# Altium PCB Right-PCB-v1.0.PcbDoc (part 2 of 2)
Units mil, origin at the board's own origin, x right, y up, seen from the top; angles counter-clockwise.
Board outline 1062.99 x 944.88 mil, 4 copper layers (Top Layer, GND, PWR, Bottom Layer), stack 45.118 mil thick; 85 components, 60 nets, 287 pads, 128 vias.
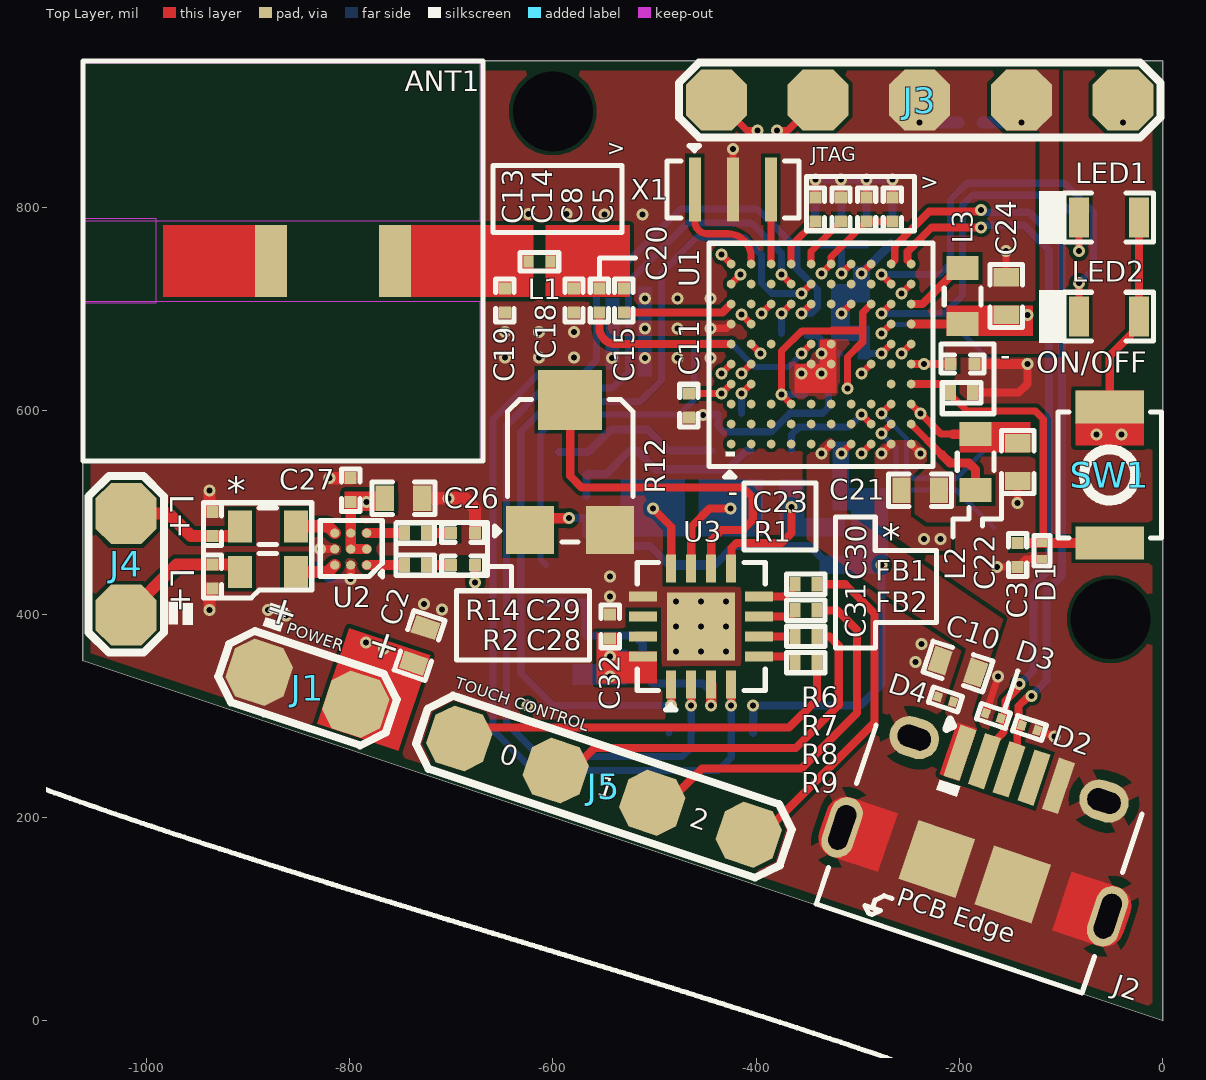
[diagram p0: Top Layer view]

## Via types
v1: diameter 11.81, hole 5.91, Top Layer to Bottom Layer, tented both sides, 128 vias

## Nets (pads, with @x,y where several pads share a name; then routed paths per layer and width w, separated by ;. In a path a pad name is that pad's centre, name@x,y a point inside that pad or via, vN(x,y) a via of type N, cw(c..) or ccw(c..) an arc to the next point about the centre after c; other vN are vias at no path point) (continued)
EASY_TUNE: SB6.1 U1.E6 | length 482.7
  Top Layer w7: v1(-355.22,656.46) U1.E6
  Bottom Layer w6: SB6.1 -612.39,454 -612.39,577.32 -593.25,596.46 -475.75,596.46 -461.02,611.18 -461.02,659.48 -453.12,667.38 -425.55,667.38 -401.26,643.1 -368.59,643.1 v1(-355.22,656.46)
GND: C1.2 C2.2 C3.1 C4.1 C5.1 C6.1 C7.2 C8.1 C9.2 C10.2 C11.1 C12.2 C13.2 C14.2 C16.2 C17.1 C18.1 C19.1 C21.1 C22.1 C23.1 C24.1 C25.1 C26.1 C27.1 C29.1 C30.1 C31.1 C32.2 D1.1 D2.1 D3.1 D4.1 J1.2 J2.5 J2.MP1 J2.MP2 J2.S1 J2.S2 J2.S3 J2.S4 J3.3 R1.2 R12.3 R13.2 SB2.1 SB4.1 SB10.2 SB14.2 U1.A7 U1.E5 U1.F5 U1.F6 U2.A2 U2.B3 U3.13 U3.17 X1.2 | length 1243.3
  Top Layer w7: C11.1 -464.53,595.08 -453.42,595.08 v1(-452.5,596) ; v1(-445,681.35) -429.21,681.35 -425.03,685.53 U1.A7 ; X1.2 v1(-422.83,858) ; v1(-355.22,636.78) U1.E5 ; C13.2 v1(-341.51,827.84) ; v1(-335.54,636.78) U1.F5 ; v1(-335.54,656.46) U1.F6 ; C14.2 v1(-316.4,827.84) ; C8.1 v1(-291.29,827.84) ; C5.1 v1(-265.87,827.84) ; C23.1@-186.02,645.17 C23.1 ; D3.1 -173.53,303.53 v1(-161.74,338.76) ; v1(-162.74,446.42) C3.1 -134.76,454.29 D1.1 ; C24.1 v1(-154,757.27) ; v1(-142.64,509.5) C22.1 ; D2.1 -122.99,285.36 v1@-106.79,279.94
  Top Layer w8: v1(-829.31,464) U2.B3 ; v1(-799,434.8) U2.A2 ; R1.2 -141.47,618 -133,626.47 v1(-133,646.16)
  Top Layer w10: C23.1 v1(-133,646.16)
  Top Layer w12: v1(-938,404.14) C31.1@-938,425.21 ; C30.1@-938,500.43 v1(-938,521.5) ; v1(-820.07,533.81) C27.1 ; C26.1 -686.55,514 -676.58,504.02 C29.1
  Bottom Layer w7: v1(-452.5,596) -451.8,596.7 -438.6,596.7 C12.2 ; v1@-452.5,597.09 v1@-452.34,597.25 ; C12.2@-437.59,597.09 -437.59,584.76 -432.31,579.48 -384.97,579.48 -366.77,597.68 -334.61,597.68 -328.94,603.34 -328.94,630.18 v1(-335.54,636.78) ; v1(-355.22,636.78) v1(-335.54,636.78) ; C16.2 -349.6,674.46 -340.31,674.46 -335.54,669.69 v1(-335.54,656.46) ; C6.1 C6.1@-341.76,787.87 ; v1@-341.76,827.6 v1(-341.51,827.84) ; C7.2 v1(-335.54,656.46) ; v1(-316.4,827.84) v1@-316.13,827.57 ; C4.1@-316.13,787.9 C4.1 ; v1(-335.54,636.78) v1(-335.54,656.46)
  Bottom Layer w8: v1(-829.31,464) -829.31,443.16 -820.94,434.8 v1(-799,434.8) ; C6.1@-341.76,787.87 v1@-341.76,827.6 ; v1(-341.51,827.84) v1(-316.4,827.84) v1(-291.29,827.84) ; C4.1@-316.13,787.9 v1@-316.13,827.57 ; C17.1 v1(-291.29,827.84) ; C1.2 v1(-265.87,827.84) v1(-291.29,827.84)
  Bottom Layer w12: v1(-239.09,884) C25.1
  other v1: -106.48,279.31 -242.93,352.81 -478.62,363.27 -454.02,363.27 -429.41,363.27 -237.25,370.67 -478.62,387.87 -454.02,387.87 -429.41,387.87 -862.8,398.46 -880.65,404.14 -709.1,404.44 -726.95,410.12 -478.62,412.48 -454.02,412.48 -429.41,412.48 -543.62,417.4 -543.62,437.09 -703,514 -541.67,651.87 -509.44,651.87 -477.22,651.87 -445,651.87 -647.08,652.44 -613.48,652.44 -579.48,652.44 -647.08,677.67 -613.69,677.87 -579.48,677.67 -509.44,681.35 -477.22,681.35 -509.44,710.83 -477.22,710.83 -445,710.83 -624.05,793.86 -586.65,793.7 -549.25,793.54 -511.85,793.39
LDO31_VO: C9.1 C23.2 C25.2 J3.2 U1.C8 U1.D3 U1.H8 U1.K5 | length 329
  Top Layer w7: v1(-394.59,695.83) U1.C8 ; v1@-373.61,616.17 v1(-374.91,616.17) ; U1.D3 v1(-374.91,616.17) ; -316.84,678.84 -354.94,678.84 -374.91,658.87 v1(-374.91,616.17) ; v1(-309.95,622.07) -309.95,653.05 -295,668 -295,697 U1.H8
  Top Layer w8: U1.K5 v1(-234.55,646.16) C23.2
  Bottom Layer w7: v1(-374.91,616.17) C9.1
  Bottom Layer w12: C25.2 v1(-138.91,884)
LED1: LED1.2 U1.J8 | length 381.4
  Top Layer w7: v1(-276.48,695.83) U1.J8 ; v1(-82.32,757.27) LED1.2
  Bottom Layer w7: v1(-276.48,695.83) -214.59,695.83 -196.94,713.48 -196.94,802.4 -187.06,812.28 -106.97,812.28 -82.32,787.63 v1(-82.32,757.27)
LED2: LED2.2 U1.J9 | length 416.4
  Top Layer w7: v1(-276.48,734.28) U1.J9 ; LED2.2 v1(-82.32,725.87)
  Bottom Layer w7: v1(-276.48,734.28) -219.53,734.28 -208.75,745.06 -208.75,808.03 -192.69,824.09 -96.37,824.09 -68,795.73 -68,740.2 v1(-82.32,725.87)
MFB: C3.2 D1.2 R1.1 SW1.2 U1.K4 | length 357.1
  Top Layer w7: R1.1@-208.42,615.79 -192.44,599.81 -125.22,599.81 -117.4,591.99 -117.4,470.48 -117.83,470.04 D1.2
  Top Layer w8: U1.K4 -215.17,626.47 -208.66,619.97 R1.1
  Top Layer w10: C3.2 D1.2 ; D1.2@-117.83,470.04 SW1.2
NetANT1_1: ANT1.1 C19.2 L1.2
NetC12_1: C12.1 U1.B4 | length 33
  Top Layer w7: v1(-414.28,617.09) U1.B4
  Bottom Layer w7: C12.1 v1(-414.28,617.09)
NetC13_1: C13.1 U1.D10 | length 51.9
  Top Layer w7: U1.D10 -365.53,762.49 C13.1
NetC14_1: C14.1 U1.E10 | length 54.1
  Top Layer w7: U1.E10 -345.84,757.06 C14.1
NetC15_2: C15.2 C18.2 C20.2 L1.1
NetC28_2: C28.2 R2.1 | length 24.3
  Top Layer w10: R2.1 C28.2
NetC29_2: C29.2 R14.1 | length 24.3
  Top Layer w10: R14.1 C29.2
NetFB1_1: FB1.1 U2.C3 | length 40.8
  Top Layer w12: FB1.1 -821.46,486.46 U2.C3
NetFB2_1: FB2.1 U2.A3 | length 40.8
  Top Layer w12: FB2.1 -821.46,441.54 U2.A3
NetP1_1: P1.1 U1.J7 | length 142.9
  Top Layer w7: v1(-276.48,676.15) U1.J7
  Bottom Layer w5: v1(-276.48,676.15) -267.7,684.93 -205.27,684.93 P1.1
NetP2_1: P2.1 U1.J3 | length 183.8
  Top Layer w7: v1(-276.48,597.41) U1.J3
  Bottom Layer w5: v1(-276.48,597.41) -251.79,572.71 -251.79,540.07 -245.41,533.7 -202.8,533.7 P2.1
NetP3_1: P3.1 U1.J2 | length 178.4
  Top Layer w7: v1(-276.48,577.72) U1.J2
  Bottom Layer w5: v1(-276.48,577.72) -262.15,563.38 -262.15,534.49 -249.87,522.22 -203.22,522.22 P3.1
NetR2_2: R2.2 U2.A1 | length 37.1
  Top Layer w10: U2.A1 R2.2
NetR6_1: R6.1 U3.8 | length 41.2
  Top Layer w8: U3.8 -371.91,417.4 -361.84,427.46 R6.1
NetR7_2: R7.2 U3.7 | length 38.7
  Top Layer w8: U3.7 -365.87,397.72 -361.84,401.75 R7.2
NetR8_2: R8.2 U3.6 | length 35.1
  Top Layer w8: U3.6 R8.2
NetR9_2: R9.2 U3.5 | length 38.8
  Top Layer w8: U3.5 -365.95,358.35 -361.84,354.24 R9.2
NetR14_2: R14.2 U2.C1 | length 37.1
  Top Layer w10: U2.C1 R14.2
NetSB1_2: SB1.2 SB2.2 SB5.2 U3.9 | length 111
  Top Layer w8: U3.9 -424.17,445.28 -424.17,465.31 -419.48,470 -375,470 -365.28,479.72 v1(-365.28,505.39)
NetSB3_2: SB3.2 SB4.2 SB6.2 U3.3 | length 269.5
  Top Layer w10: v1(-444.17,310) U3.3
  Bottom Layer w8: SB6.2 SB4.2 SB3.2 -520.22,379 -511.59,370.37 -511.59,341.32 -502.01,331.73 -452.49,331.73 -444.17,323.41 v1(-444.17,310)
OUT_0: R3.1 U1.E8 U3.4 | length 1172.1
  Top Layer w7: v1(-355.22,695.83) U1.E8
  Top Layer w8: v1(-424.49,310) U3.4
  Bottom Layer w7: v1(-424.49,310) -424.49,258.95 -437.28,246.16 -619.21,246.16 -659.14,286.08 -659.14,591.4 -614.11,636.43 -570.41,636.43 -556.99,649.85 -556.99,716.33 -474.45,798.87 -398.77,798.87 -359.96,760.06 -359.96,739.93 -339.45,719.43 -339.45,701.76 -345.38,695.83 v1(-355.22,695.83)
OUT_1: R4.1 U1.D9 U3.2 | length 1005.4
  Top Layer w7: v1(-374.91,734.28) U1.D9
  Top Layer w8: v1(-463.86,310) U3.2
  Bottom Layer w7: v1(-463.86,310) -463.86,283 R4.1 -463.93,268.73 -472.62,260.04 -613.08,260.04 -645.5,292.47 -645.5,585.92 -609,622.43 -541.64,622.43 -525.65,638.42 -525.65,726.85 -467.64,784.85 -404.55,784.85 -374.91,755.21 v1(-374.91,734.28)
OUT_2: R5.1 U1.E9 U3.1 | length 889.8
  Top Layer w7: v1(-355.22,715.52) U1.E9
  Top Layer w8: v1(-483.54,310) U3.1
  Bottom Layer w7: v1(-483.54,310) R5.1 -599.74,310 -631.68,341.93 -631.68,579.78 -602.03,609.43 -513.96,609.43 -493.29,630.1 -493.29,735.89 -458.59,770.59 -411.59,770.59 -394.67,753.67 -394.67,725.86 -384.33,715.52 v1(-355.22,715.52)
OUT_L+: C30.2 FB1.2 J4.1 | length 127.5
  Top Layer w12: J4.1 -978.49,499 -956.3,476.81 -913.7,476.81 -907.89,482.62 FB1.2
OUT_L-: C31.2 FB2.2 J4.2 | length 148.5
  Top Layer w12: J4.2 -970.17,448.83 -938,448.83 -913.7,448.83 -907.89,443.02 -907.89,437.92 FB2.2@-913.7,432.11
PA1OP: C20.1 U1.A6 | length 153.8
  Top Layer w8: C20.1 -554.29,681.87 ccw(c-538.26,681.87) -538.26,665.84 U1.A6
RST_N: C16.1 J3.1 U1.D8 | length 719.6
  Top Layer w7: v1(-374.91,695.83) U1.D8
  PWR w6: v1(-374.91,695.83) -374.91,708.8 -382.83,716.72 -428.8,716.72 -436.67,724.59 -466.98,724.59 -475.41,733.02 -475.41,816.19 -463.75,827.84 -380.48,827.84 -305.77,902.55 -57.45,902.55 v1(-38.91,884)
  Bottom Layer w7: C16.1 v1(-374.91,695.83)
RTX: C15.1 U1.A8 | length 109.2
  Top Layer w8: C15.1 -432.94,696.85 U1.A8
SINGLE_BUTTON: SB5.1 U1.H2 | length 106.1
  Top Layer w7: v1(-296.17,596.48) U1.H2
  Bottom Layer w7: SB5.1 -365.07,576.71 -357.52,584.26 -308.4,584.26 v1(-296.17,596.48)
SYS_PWR: C21.2 LED1.1 LED2.1 SW1.1 U1.J1 U1.K1 U1.K6 U1.K9 | length 253.2
  Top Layer w4: v1@-257.42,657.08 v1(-256.8,656.46) ; v1@-257.42,714.9 v1(-256.8,715.52)
  Top Layer w7: v1(-276.48,558.04) U1.J1 ; v1(-256.8,656.46) U1.K6 ; v1(-256.8,715.52) U1.K9 ; U1.K1 v1(-238.04,558.04)
  Top Layer w8: SW1.1 -52,654.24 -23.27,682.97 LED1.1
  other v1: -235,473.85 -218.62,473.85 -64.8,577.02 -40.19,577.02
USB_D_N: D3.2 J2.2 U1.K10 | length 704.3
  Top Layer w7.69: U1.K10@-247.16,744.58 -250.91,748.34 -250.91,756.89 -227.16,780.65 -200.1,780.65 v1(-178.62,780.65) ; J2.2 cw(c-152.17,255.32) -168.46,271.62 -158.29,281.8 ccw(c-165.1,288.61) -155.46,288.61 -155.46,290.09 ccw(c-161.51,290.09) -157.23,294.37 -158.13,295.26 cw(c-156,297.38) D3.2 -159,298.12 -154.57,302.55 -154.57,314.58 -142.93,326.23 -142.93,327.9 -140.87,329.96 v1(-140.87,331.08)
  Bottom Layer w7.69: v1(-178.62,780.65) -177.51,780.65 -175.35,782.8 -136.4,782.8 -111.69,758.09 -111.69,443.31 -127.04,427.96 -127.04,344.79 -140.75,331.08 v1(-140.87,331.08)
USB_D_P: D2.2 J2.3 U1.J10 | length 752.1
  Top Layer w7.69: U1.J10 -267.1,744.85 -263.61,748.34 -263.61,762.15 -229.55,796.2 -197.71,796.2 -182.99,796.2 -182.33,796.87 -179.42,796.87 v1(-178.63,797.65) ; J2.3 -143.04,268.53 -143.04,279.13 cw(c-128.76,279.13) -139.59,288.45 ccw(c-145.45,293.42) -139,289.23 -138.71,289.69 D2.2 -138.34,291.73 -141.88,295.27 -141.88,309.33 -133.76,317.45 -132.2,317.45 -130.14,319.51 v1(-129.03,319.51)
  Bottom Layer w7.69: v1(-178.63,797.65) -177.52,797.65 -175.36,795.5 -131.14,795.5 -99,763.35 -99,438.05 -114.35,422.7 -114.35,334.19 v1(-129.03,319.51)
V_USB: C10.1 D4.2 J2.1 U1.F1 | length 13.3
  Top Layer w7: v1(-335.54,558.04) U1.F1
VBAT: C2.1 C26.2 C27.2 C32.1 J1.1 R3.2 R4.2 R5.2 R10.1 R12.1 SB1.1 SB3.1 SB7.2 SB11.2 U1.G1 U2.B1 U2.B2 U2.C2 U3.16 | length 703.5
  Top Layer w7: v1(-315.85,558.04) U1.G1
  Top Layer w8: R12.1 R12.1@-610.86,494.41
  Top Layer w10: C27.2 U2.C2 U2.B2 U2.B1 ; R12.1@-610.86,494.41 v1(-584,494.41)
  Bottom Layer w7: R4.2 R4.2@-485.58,284.9
  Bottom Layer w8: v1(-584,494.41) -583.96,494.46 R10.1@-566.93,494.46 ; R10.1 R10.1@-566.93,494.46 ; SB7.2 -486.01,448.5 -504.51,467 -556.37,467 -566.93,477.56 R10.1@-566.93,494.46 ; SB11.2 -440.67,448.5 -422.17,467 -347,467 -328.5,448.5 SB1.1 ; R3.2 v1(-402.83,310) -297.08,310 -276.48,330.59 v1(-276.48,448.5)
  Bottom Layer w10: SB7.2 SB11.2
  other v1: -625,310 -543.62,338.66 -543.62,358.35 -766.19,366.41 -784.05,372.09 -783.25,510.19
VCC_RF: C5.2 C8.2 U1.A10 U1.F10 | length 108.3
  Top Layer w7: v1(-433.96,753.96) U1.A10 ; v1(-335.54,735.2) U1.F10 -326.16,751.64 C8.2 C5.2
XO_N: U1.C10 X1.3 | length 73.5
  Top Layer w7: X1.3 -385.32,817.89 -385.32,744.69 U1.C10
XO_P: U1.B10 X1.1 | length 113.7
  Top Layer w7: X1.1 -460.24,786.5 ccw(c-448.13,786.5) -448.13,774.39 -427.87,774.39 cw(c-427.87,751.43) -404.9,751.43 U1.B10
pads on no net: ANT1.2 J2.4 U1.A1 U1.A2 U1.A3 U1.B1 U1.B2 U1.B3 U1.B8 U1.B9 U1.C1 U1.C2 U1.C3 U1.C6 U1.C9 U1.D1 U1.D2 U1.E1 U1.E2 U1.E3 U1.F2 U1.F3 U1.F8 U1.F9 U1.G2 U1.G3 U1.G9 U1.H3 U1.H9 U1.J4 U1.J5 U3.14 U3.15

## Polygon pours and split planes (outlines as drawn)
VBAT on Bottom Layer "VBAT_L04_P021" (solid, pour order 21): -634.83,319 -634.83,295.3 -615.18,275.65 -480.26,275.65 -480.26,293.66 -598,293.66 -623.34,319
LDO31_VO on Bottom Layer "LDO31_VO_L04_P018" (solid, pour order 18): -317.55,630.22 -317.55,606 -228,606 -228,656 -244,656 -244,630.22
GND on Bottom Layer "GND_L04_P000" (solid, remove dead copper, pour order 0): -667.17,935 -667.17,548 -1055,548 -1055,361.33 -10,13 -10,935
1V5 on Bottom Layer "1V5_L04_P002" (solid, pour order 2): -433,743 -433,679 -405.84,679 -405.84,743
SYS_PWR on Bottom Layer "SYS_PWR_L04_P001" (solid, pour order 1): -249,650.56 -249,663 -223,663 -223,574.19 -244,574.19 -244,545 -205.27,545 -205.27,674.46 -265,674.46 -265,650.56
VBAT on PWR "VBAT_L03_P019" (solid, pour order 19): -667.17,935 -667.17,548 -1055,548 -1055,361.33 -10,13 -10,935
SYS_PWR on PWR "SYS_PWR_L03_P017" (solid, pour order 17): -470,485 -470,412.48 -10,412.48 -10,890 -112,890 -112,485
1V5 on PWR "1V5_L03_P012" (solid, pour order 12): -390,745 -390,723.74 -423.74,723.74 -433.23,733.23 -462.41,733.23 -462.41,745
1V5 on PWR "1V5_L03_P007" (solid, pour order 7): -242.19,637 -242.19,583.18 -190,583.18 -190,890 -464,890 -464,733.22 -447,733.31 -447,772 -322,772 -322,727.35 -306,727.35 -306,747 -230.24,747 -230.24,637
1V2 on PWR "1V2_L03_P009" (solid, pour order 9): -286.39,611 -286.39,631 -326.5,631 -326.49,701.69 -309,701.69 -309,666 -270,666 -270,611
VCC_RF on PWR "VCC_RF_L03_P008" (solid, pour order 8): -441.29,768 -441.29,748 -361,748 -361,727.35 -327.1,727.35 -327.07,727.32 -327.07,768
SYS_PWR on PWR "SYS_PWR_L03_P003" (solid, pour order 3): -274.08,542 -282,549.92 -282,567 -266,567 -266,740 -234.55,740 -234.55,660.51 -246.79,660.51 -246.81,578 -190,578 -190,542
LDO31_VO on PWR "LDO31_VO_L03_P006" (solid, pour order 6): -309,608 -291,608 -291,627 -365,627 -365,667 -331,667 -331,706 -304,706 -304,682.43 -287,682.43 -287,723 -345,723 -345,686 -384.47,686 -384.47,707.72 -404,707.72 -404,682 -385.03,663.03 -385.03,644.19 -404,644.19 -404,606.51 -404,570 -345.23,570 -309,570
1V8 on PWR "1V8_L03_P005" (solid, pour order 5): -184,890 -184,536 -276,536 -287,547 -287,567 -305,567 -305,546.85 -315.85,536 -424,536 -424,625 -470,625 -470,494 -119,494 -119,890
GND on Top Layer "GND_L01_P011" (solid, remove dead copper, pour order 11): -667.17,935 -667.17,548 -1055,548 -1055,361.33 -10,13 -10,935
V_USB on Top Layer "V_USB_L01_P016" (solid, pour order 16): -219.47,242.11 -204.68,286.33 -213.87,302.88 -208.36,319.34 -195.08,359.13 -192.97,366.04 -264.01,412.51 -350.37,473.77 -350.37,555.75 -328.74,572.97 -321.76,572.97 -321.86,566.18 -328.17,559.29 -328.17,550.78 -328.07,544.86 -310.82,544.78 -310.82,500 -156.77,395.1 -179.28,327.78 -187.83,300.75 -182.77,287.34 -200.07,235.62
SYS_PWR on Top Layer "SYS_PWR_L01_P010" (solid, pour order 10): -283,489.75 -242.87,462.17 -208.42,462.17 -208.42,486.18 -233.37,486.18 -248,496.57 -248,534.5 -232,550.5 -232,561 -242.23,571.23 -271.77,571.23 -283,560
LDO31_VO on Top Layer "LDO31_VO_L01_P004" (solid, pour order 4): -154,876 -121,876 -121,668.46 -214.57,668.46 -214.57,640.26 -202.76,640.25 -202.76,656.47 -102,656.47 -102,936 -154,936
GND on GND "GND_L02_P020" (solid, pour order 20): -667.17,935 -667.17,548 -1055,548 -1055,361.33 -10,13 -10,935

## Other copper
Top Layer:
  rectangle net LDO31_VO: -327,675 -292,683
  rectangle net GND: -337.28,617.84 -321,670.24
  rectangle net GND: -362,617.84 -321,646
  region net V_USB: -219.47,242.11 -200.07,235.62 -182.77,287.34 -202.16,293.83
  rectangle net VBAT: -557.07,331.78 -497.32,363.27
  rectangle net VBAT: -557.07,331.78 -535.66,381.97
  region net VBAT: -832.14,291.98 -751.95,265.31 -720.61,359.52 -800.8,386.19
  rectangle net VBAT: -804.91,501.5 -756.64,520.55
  rectangle net SYS_PWR: -85.87,565.76 -18.15,620.04
  rectangle net 1V5: -199.75,559.06 -130.14,588.93
  rectangle net 1V8: -212.6,673.72 -127.39,703.59
  rectangle net NetC15_2: -607.36,711.95 -524.37,782.81
  rectangle net NetANT1_1: -763.37,711.95 -619.17,782.81
PWR:
  pour cut-out: -420,589 -419.93,589.07 -408.25,589.07 -408.25,603.6 -419.67,603.6 -419.67,589
Bottom Layer:
  region net 1V2: -261.16,763.84 -267.55,770.22 -302.2,735.56 -295.82,729.18
  rectangle net GND: -548.42,640.96 -534.43,711.31
  rectangle net GND: -516.34,633.86 -502.36,722.71
  rectangle net 1V2: -304.79,706.95 -287.77,741.94
  rectangle net 1V2: -326.17,706.95 -287.77,724.74
  rectangle net 1V2: -300.09,650.56 -287.92,680.85
  rectangle net 1V2: -326.17,668.79 -287.92,684.28
  rectangle net 1V2: -326.17,668.79 -307.39,724.74
  rectangle net VBAT: -337.5,439.5 -270,457.75
  rectangle net VBAT: -306.62,439.66 -270,524
  rectangle net VBAT: -325,502 -270,524
  rectangle net VBAT: -325,502 -308.4,570
  rectangle net VBAT: -551.31,333 -526.83,365.39
  rectangle net VBAT: -580.5,330.04 -526.83,351
  rectangle net CFG1: -456.67,476.5 -393.34,533
  rectangle net CFG0: -533.34,476.5 -470.01,533
  rectangle net NetSB1_2: -377.57,476.5 -312.5,494.5
  rectangle net NetSB1_2: -377.57,476.5 -352.57,533

## Silkscreen, mask and mechanical layers (free items; w line width, h text height)
Top Overlay:
  drawing of 1424 lines, arcs and shapes, not listed
  text ">" at -546.97,845.65 h27.56
  text "JTAG" at -345.84,840.66 h23.62
  text ">" at -238.54,812.12 h27.56
  text "-" at -159.89,637.81 h35.43
  text "ON/OFF" at -124.48,630.65 h35.43
  text "L+" at -984.5,518 h39.37 r270
  text "-" at -428,503.02 h35.43
  text "*" at -921.07,499.48 h47.24
  text "TRANSDUCER" at -1255.51,465.45 h45 r90
  text "*" at -276.37,452.86 h47.24
  text "L+" at -984.01,444.95 h39.37 r270
  text "+" at -889.76,386.21 h49.21 r341.6
  text "POWER" at -864.33,377.57 h19.68 r341.6
  text "+" at -788.58,352.5 h49.21 r341.6
  text "TOUCH CONTROL" at -698.67,323.85 h19.68 r341.6
  text "0" at -654.33,254.73 h19.68 r341.6
  text "1" at -558.22,222.7 h19.68 r341.6
  text "2" at -466.95,191.86 h19.68 r341.6
  text "BATTERY" at -3518.95,120.51 h45
Bottom Overlay:
  lines w5: -677,464.49 -677,474 -565.72,474 -565.72,463.28 ; -622.53,505.33 -576.89,505.33 ; -469.04,655.36 -460.17,646.49 -460.17,573.5 ; -428.17,685.15 -389.84,646.81 ; -389.84,573.5 -389.84,646.49
  text "RTS" at -67.92,629.46 h35.43
  text "TXD" at -72.39,558.65 h35.43
  text "RXD" at -70.48,473.65 h35.43
  text "Rev-v1.0 (RIGHT)" at -401.59,154.1 h39.37 r342
Board Outline:
  the board outline again, w5
Fabrication:
  drawing of 295 lines, arcs and shapes, not listed
  text "Layer" at 848.34,989 h60
  text "Name" at 1258.26,989 h60
  text "Material" at 2188,989 h60
  text "Thickness" at 3047.77,989 h60
  text "Constant" at 3697.6,989 h60
  text "Board Layer Stack" at 4267.46,989 h60
  text "Top Overlay" at 1258.26,869 h60
  text "Top Solder" at 1258.26,749 h60
  text "Solder Resist" at 2188,749 h60
  text "1.20mil" at 3047.77,749 h60
  text "3.8" at 3697.6,749 h60
  text "1" at 848.34,629 h60
  text "Top Layer" at 1258.26,629 h60
  text "CF-004" at 2188,629 h60
  text "1.38mil" at 3047.77,629 h60
  text "Dielectric 2" at 1258.26,509 h60
  text "PP-006" at 2188,509 h60
  text "7.99mil" at 3047.77,509 h60
  text "4.4" at 3697.6,509 h60
  text "2" at 848.34,389 h60
  text "GND" at 1258.26,389 h60
  text "1.38mil" at 3047.77,389 h60
  text "Dielectric 1" at 1258.26,269 h60
  text "FR-4" at 2188,269 h60
  text "23.62mil" at 3047.77,269 h60
  text "4.6" at 3697.6,269 h60
  text "3" at 848.34,149 h60
  text "PWR" at 1258.26,149 h60
  text "1.38mil" at 3047.77,149 h60
  text "Dielectric 3" at 1258.26,29 h60
  text "PP-006" at 2188,29 h60
  text "7.99mil" at 3047.77,29 h60
  text "4.4" at 3697.6,29 h60
  text "4" at 848.34,-91 h60
  text "Bottom Layer" at 1258.26,-91 h60
  text "CF-004" at 2188,-91 h60
  text "1.38mil" at 3047.77,-91 h60
  text "Bottom Solder" at 1258.26,-211 h60
  text "Solder Resist" at 2188,-211 h60
  text "1.20mil" at 3047.77,-211 h60
  text "3.8" at 3697.6,-211 h60
  text "Bottom Overlay" at 1258.26,-331 h60
  text "Total board thickness:" at 848.34,-451 h60
  text "47.52mil" at 3047.77,-451 h60
Drill Drawing:
  circle w10: c889.05,1923.33 r33.33
  lines w10: 855.71,1806.66 922.38,1806.66 889.05,1739.99 855.71,1806.66 ; 855.71,2039.99 922.38,2039.99 922.38,2106.66 855.71,2106.66 855.71,2039.99 ; 855.71,2206.66 872.38,2206.66 889.05,2189.99 905.71,2206.66 922.38,2206.66 905.71,2223.33 922.38,2239.99 905.71,2239.99 889.05,2256.66 872.38,2239.99 855.71,2239.99 872.38,2223.33 855.71,2206.66
  lines w15: 795.92,1694.99 10753.14,1694.99 ; 795.92,2294.99 10753.14,2294.99 ; 1346.8,1544.99 1346.8,2444.99 ; 1936.64,1544.99 1936.64,2444.99 ; 3036.32,1544.99 3036.32,2444.99 ; 3542.2,1544.99 3542.2,2444.99 ; 4276,1544.99 4276,2444.99 ; 5775.55,1544.99 5775.55,2444.99 ; 6365.4,1544.99 6365.4,2444.99 ; 7111.2,1544.99 7111.2,2444.99 ; 8250.86,1544.99 8250.86,2444.99 ; 9350.54,1544.99 9350.54,2444.99 ; 795.92,1544.99 10753.14,1544.99 10753.14,2444.99 795.92,2444.99 795.92,1544.99
  text "Symbol" at 885.92,2339.99 h72
  text "Count" at 1391.8,2339.99 h72
  text "Hole Size" at 1981.64,2339.99 h72
  text "Plated" at 3081.32,2339.99 h72
  text "Hole Type" at 3587.2,2339.99 h72
  text "Drill Layer Pair" at 4321,2339.99 h72
  text "Via/Pad" at 5820.55,2339.99 h72
  text "Pad Shape" at 6410.4,2339.99 h72
  text "Template" at 7156.2,2339.99 h72
  text "Hole Length" at 8295.86,2339.99 h72
  text "Routed Path Length" at 9395.54,2339.99 h72
  text "128" at 1391.8,2189.99 h60
  text "5.91mil (0.150mm)" at 1981.64,2189.99 h60
  text "PTH" at 3081.32,2189.99 h60
  text "Round" at 3587.2,2189.99 h60
  text "Top Layer - Bottom Layer" at 4321,2189.99 h60
  text "Via" at 5820.55,2189.99 h60
  text "Rounded" at 6410.4,2189.99 h60
  text "v30h15" at 7156.2,2189.99 h60
  text "-" at 8295.86,2189.99 h60
  text "-" at 9395.54,2189.99 h60
  text "2" at 1391.8,2039.99 h60
  text "19.69mil (0.500mm)" at 1981.64,2039.99 h60
  text "PTH" at 3081.32,2039.99 h60
  text "Slot" at 3587.2,2039.99 h60
  text "Top Layer - Bottom Layer" at 4321,2039.99 h60
  text "Pad" at 5820.55,2039.99 h60
  text "Rounded" at 6410.4,2039.99 h60
  text "r80_155h50_115r100" at 7156.2,2039.99 h60
  text "45.28mil (1.150mm)" at 8295.86,2039.99 h60
  text "25.59mil (0.650mm)" at 9395.54,2039.99 h60
  text "2" at 1391.8,1889.99 h60
  text "21.65mil (0.550mm)" at 1981.64,1889.99 h60
  text "PTH" at 3081.32,1889.99 h60
  text "Slot" at 3587.2,1889.99 h60
  text "Top Layer - Bottom Layer" at 4321,1889.99 h60
  text "Pad" at 5820.55,1889.99 h60
  text "Rounded" at 6410.4,1889.99 h60
  text "r100_125h55_85r100" at 7156.2,1889.99 h60
  text "33.47mil (0.850mm)" at 8295.86,1889.99 h60
  text "11.81mil (0.300mm)" at 9395.54,1889.99 h60
  text "2" at 1391.8,1739.99 h60
  text "78.74mil (2.000mm)" at 1981.64,1739.99 h60
  text "NPTH" at 3081.32,1739.99 h60
  text "Round" at 3587.2,1739.99 h60
  text "Top Layer - Bottom Layer" at 4321,1739.99 h60
  text "Pad" at 5820.55,1739.99 h60
  text "Rounded" at 6410.4,1739.99 h60
  text "c0hn200" at 7156.2,1739.99 h60
  text "-" at 8295.86,1739.99 h60
  text "-" at 9395.54,1739.99 h60
  text "134 Total" at 1391.8,1589.99 h60
  text "Slot definitions :" at 885.92,1445.02 h60
  text "Routed Path Length" at 1918.61,1445.02 h60
  text "= Calculated from tool start centre position to tool end centre position." at 3021.28,1445.02 h60
  text "Hole Length" at 1918.61,1345.05 h60
  text "= Routed Path Length + Tool Size = Slot length as defined in the PCB layout" at 2611.41,1345.05 h60

## Dimensions
-1062.99,944.88 to 0,944.88 on Dimensions
0,0 to -1062.99,354.33 on Dimensions
-1062.99,354.33 to -1062.99,944.88 on Dimensions

## Text inside footprints (layer, text, board x,y; h text height)
J2: Top Overlay "PCB Edge" at -265.06,108.25 h31.5 r341.5